# Altium PCB DC116A_PCB.PcbDoc (part 5 of 5)
Units mil, origin at the board's own origin, x right, y up, seen from the top; angles counter-clockwise.
Board outline 3300 x 2000 mil, 4 copper layers (Top Layer, GND1, PWR SPLIT PLANE, Bottom Layer), stack 58.64 mil thick; 315 components, 191 nets, 877 pads, 364 vias.
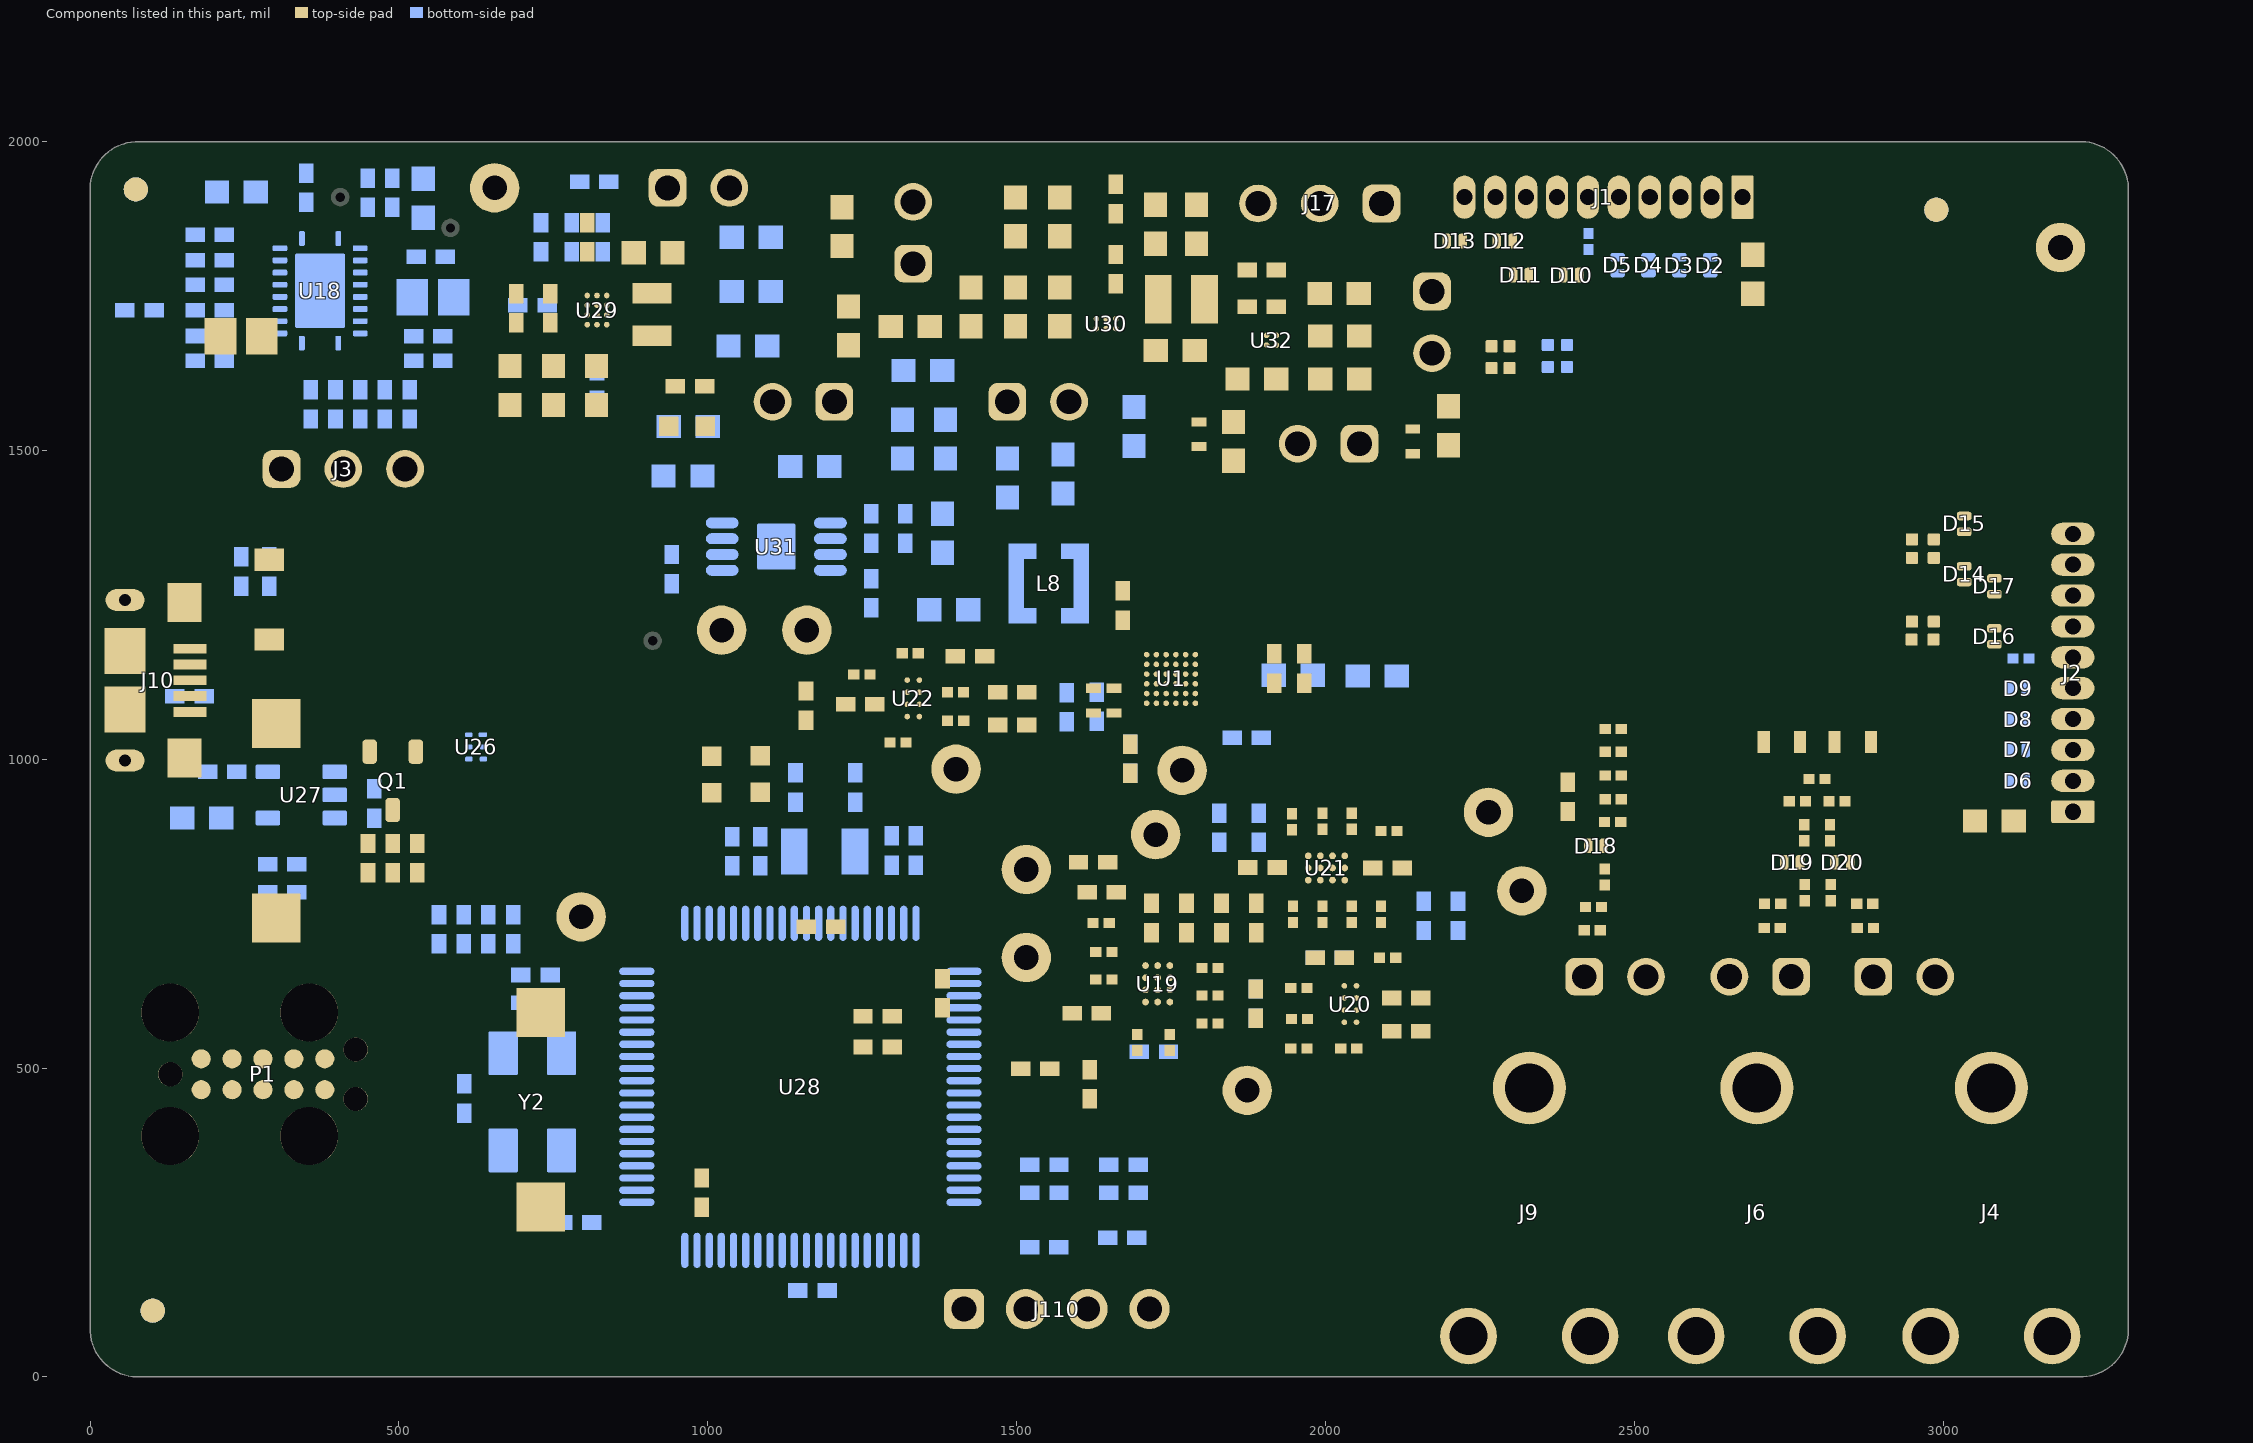
[diagram p6: the components of this part, seen from the top]

## Other copper
Top Layer:
  pour cut-out: 2273.54,1677.86 2268.4,1672.72 2268.4,1634.91 2272.99,1630.31 2297.54,1630.31 2303.83,1636.6 2303.83,1675.55 2302.54,1676.84
  pour cut-out: 2954,1365.27 2948.86,1360.13 2948.86,1322.32 2953.45,1317.72 2978,1317.72 2984.29,1324.01 2984.29,1362.96 2981.98,1365.27
  pour cut-out: 2954,1232.02 2948.86,1226.87 2948.86,1189.07 2953.45,1184.47 2978,1184.47 2984.29,1190.76 2984.29,1229.71 2983,1231
  pour cut-out: 1620.19,309.72 1619.17,310.73 1591.61,310.73 1591.61,330.97 1620,330.97
  pour cut-out: 1620,330.97
  pour cut-out: 1591.61,330.97
  pour cut-out: 441.16,677.96 441.16,665.23 443.94,662.45 447.96,662.45 447.96,677.01 445.28,679.69 444.22,679.69 442.21,677.68
  pour cut-out: 1706.44,1168.34 1706.44,1103.6 1713.04,1096.99 1780.54,1096.99 1784.46,1100.92 1784.46,1163.62 1771.25,1176.84 1714.94,1176.84
  pour cut-out: 1675.77,749.57 1931.08,749.57 1931.55,749.1 1931.55,740.35 1927.87,736.67 1678.79,736.67 1674.16,741.3 1674.16,742.99 1674.16,749.1
  pour cut-out: 1360.19,658.68 1360.19,692.08 1362.46,694.35 1367.36,694.35 1370.25,691.46 1370.25,663.21 1365.34,658.3 1364.97,658.68
  pour cut-out: 591.42,500.27 596.99,494.7 613.15,494.7 618.36,499.9 618.36,515.59 612.69,521.26 596.77,521.26 591.42,515.91
  pour cut-out: 714.82,1913.32 714.82,1890.45 716.34,1888.93 742.23,1888.93 744.37,1891.07 744.37,1912.24 739.65,1916.97 718.33,1916.97 714.98,1913.61
  pour cut-out: 1654.69,1707.71 1654.69,1683.34 1661.61,1676.43 1667.14,1676.43 1672.67,1670.9 1672.67,1657.59 1688.05,1642.21 1744.9,1642.21 1747.15,1644.46 1747.15,1694.23 1740.24,1701.14 1684.42,1701.14 1677.16,1708.4 1676.99,1708.23 1655.56,1708.23
  pour cut-out: 1323.96,1727.54 1331.65,1727.54 1332.08,1727.12 1332.08,1723.6 1331.06,1722.58 1323.93,1722.58 1322.44,1724.07 1322.45,1724.07 1322.45,1725.4
  pour cut-out: 1164.21,1841.07 1138.18,1841.07 1134.37,1844.88 1137.38,1847.89 1157.78,1847.89 1161.32,1844.36
  pour cut-out: 21.06,1335.41 21.06,911.82 14.73,905.48 1.78,905.48 0.11,907.16 0.11,1340.05 4.04,1343.99 18.43,1343.99 21,1341.41
  pour cut-out: 263,460.65 263,846.65 586.65,846.65 586.65,460.65
  pour cut-out: 1028.53,969.22 1036.6,969.22 1037.87,967.95 1037.87,966.81 1037.05,966 1031.75,966
  pour cut-out: 864.33,755.72 864.33,668.09 869.21,663.2 880.13,674.12 880.13,680.16
  pour cut-out: 725.19,1682.63 725.19,1663.85 727.93,1661.11 727.93,1684.55 726.78,1685.7
  pour cut-out: 2181.54,753.34 2181.54,739.43 2182.46,738.51 2184.16,738.51 2184.94,739.29 2184.94,753.11 2184.09,753.96 2182.37,753.96 2181.69,753.28
  text "1" at 123.52,757.21 h45
  text ".Layer_Name" at 577,-858.49 h60
PWR SPLIT PLANE:
  pour cut-out: 1596.27,326.31 1597.22,325.36 1597.22,311 1621.3,311 1623.55,313.24 1623.55,328.45 1598.42,328.45
  pour cut-out: 897.32,1617.26 897.32,1612.47 899.9,1609.89 902.01,1612 918.58,1612 923.69,1617.11 911.3,1629.49 901.02,1629.49 897,1625.47
  pour cut-out: 1829.66,1645.85 1846.93,1628.51 1852.24,1628.51 1858.64,1634.91 1858.64,1640.28 1841.37,1657.56
  pour cut-out: 1104.87,1839.92 1104.87,1765.8 1107.26,1763.41 1257.9,1763.41 1263.7,1769.22 1263.7,1771.61 1158.5,1876.81 1141.76,1876.81
  pour cut-out: 1816.05,1765.03 2132.05,1765.03 2135.25,1768.23 2135.25,1855.44 2125.07,1865.62 2075.8,1865.62 2029.92,1819.75 1908.7,1819.75 1863.85,1774.9 1819.5,1774.9
  pour cut-out: 1771.33,1143.05 1762.84,1143.06 1759.27,1139.49 1759.27,1135.02 1761.04,1133.25 1765.43,1133.25 1765.43,1130.12 1760.22,1130.12 1756.16,1134.17 1756.16,1140.42 1760.62,1144.88 1770.21,1144.88 1770.63,1144.46
  pour cut-out: 2134.09,1856.71 2134.09,1774.53 2122.72,1774.33 2119.96,1777.09 2119.96,1863.53 2121.74,1865.31 2125.74,1865.31 2128.35,1862.7
  pour cut-out: 1241.3,1617.25 1241.3,1548.28 1250.49,1548.28 1250.49,1617.31
  pour cut-out: 300.17,579.45 292.48,571.76 292.48,560.95 295.16,558.27 306.14,558.27 309.25,561.38
  pour cut-out: 21.06,1335.41 21.06,911.82 14.73,905.48 1.78,905.48 0.11,907.16 0.11,1340.05 4.04,1343.99 18.43,1343.99 21,1341.41
  pour cut-out: 403.64,1389.05 403.64,1290.49 405.94,1288.18 423.48,1288.18 429.7,1294.4 429.7,1390.36 428.18,1391.88
  pour cut-out: 1123.61,1305.66 1131.27,1298 1143.76,1298 1143.76,1308.81 1140.4,1312.17
  pour cut-out: 574.85,788.48 574.85,781.52 580.36,776.01 580.98,776.63 631.11,776.63 631.11,791.11 629.8,792.42 570.54,792.42 569.36,791.24
  pour cut-out: 468.65,1174.6 468.65,1164.65 469.63,1163.67 481.35,1163.67 481.35,1175.39 480.64,1176.11 465.63,1176.11
  pour cut-out: 128.58,1671.34 128.58,1658.62 131.4,1655.79 141.72,1655.79 144.41,1658.48 144.41,1672.19 143.42,1673.18
  pour cut-out: 419.48,1518.89 409.8,1518.89 406.32,1515.41 375.31,1515.41 372.51,1512.61 372.51,1510.02 373.75,1508.77 420.54,1508.77 424.71,1512.93
  pour cut-out: 1699.11,1117.18 1722.02,1094.28 1759.54,1094.28 1772.11,1106.85 1772.11,1125.32 1765.61,1131.82 1756.85,1131.82 1756.16,1132.5 1756.16,1140.67 1758.11,1142.61 1758.11,1153.62 1701.78,1153.62 1699.11,1150.95
  pour cut-out: 1760.3,1141.98 1773.43,1141.98 1778.57,1136.83 1779.63,1136.83 1779.63,1142.74 1779.63,1146.14 1777.67,1148.1 1759.15,1148.1 1757.64,1146.59 1757.64,1143.19 1758.94,1141.88
  text "3" at 116.47,756.52 h45
  text ".layer_name" at 625,-864 h60
GND1:
  pour cut-out: 1591.61,326.31 1591.61,333.85 1588.62,336.84 1595.13,343.35 1608.65,343.35 1608.65,324.21 1608.45,324 1608.45,323
  pour cut-out: 1593.76,328.45 1591.61,326.31 1591.61,310.73 1625.69,310.73 1625.69,330.97
  pour cut-out: 1466.45,331 1466.45,309.23 1467,308.68 1469.05,310.73 1498.39,310.73 1498.39,330.97
  pour cut-out: 1466.45,328.45
  text "2" at 117,763 h45
  text ".LAYER_NAME" at 727,-857 h60
Bottom Layer:
  pour cut-out: 1543.12,361.15 1543.39,361.42 1687,361.42 1687,323 1683,319 1680,322 1538.11,322
  pour cut-out: 1481.86,328 1483.84,329.98 1738.55,329.98 1738.55,311.71 1738.27,312 1479.26,312 1479.26,316.37 1482.23,319.34
  pour cut-out: 1844.09,1071.37
  pour cut-out: 1759,1050 1759.55,1050.55 1765.39,1050.55 1765.39,1012.5 1764.03,1011.14 1757.54,1011.14 1757.54,1049.75 1756.81,1050.49
  pour cut-out: 1612.46,1103.99
  pour cut-out: 1612.46,1122.46 1605.36,1122.46 1605.36,1082.99 1607.66,1085.29 1612.23,1085.29 1612.46,1085.51
  pour cut-out: 1621.59,1127.17
  pour cut-out: 1661,1694.43 1660.93,1680.63 1669.71,1671.84 1685.56,1671.84 1693.53,1679.81 1693.53,1694.2 1685.64,1702.09 1668.66,1702.09
  pour cut-out: 1756.81,809.07 1756.81,786.37 1764.53,778.64 1785.68,778.64 1790.39,783.36 1790.39,805.94 1782.82,813.51 1761.39,813.51 1756.96,809.08
  pour cut-out: 1994.29,626.58 1994.29,603.87 2002.01,596.15 2023.16,596.15 2027.88,600.86 2027.88,623.44 2020.3,631.01 1998.87,631.01 1994.44,626.58
  pour cut-out: 1935.2,828.95 1935.2,806.25 1942.92,798.52 1964.07,798.52 1968.79,803.24 1968.79,825.82 1961.21,833.39 1939.78,833.39 1935.35,828.96
  pour cut-out: 2121.84,1568.18 2121.84,1551.09 2129.05,1543.89 2152.46,1543.89 2159.07,1550.49 2159.07,1568.9 2148.86,1579.11 2132.77,1579.11
  pour cut-out: 1045.6,1586.77 1068.61,1586.77 1070.72,1584.66 1070.72,1584.07 1067.32,1580.66 1048.22,1580.66 1045.95,1582.93
  pour cut-out: 1725.47,1158.97 1725.61,1099.63 1727.22,1098.03 1772.58,1098.03 1776.86,1102.31 1776.86,1161.37 1770.54,1167.7 1734.19,1167.7
  pour cut-out: 1256.38,963.5 1220.78,963.5 1220.78,943.5 1256.38,943.5
  pour cut-out: 1161.08,963.5 1124.33,963.5 1124.33,943.5 1161.08,943.5
  pour cut-out: 1348.77,861.37 1325.2,861.37 1325.2,841.37 1348.77,841.37
  pour cut-out: 1325.2,860.09 1277.76,860.09 1277.76,841.37 1325.2,841.37
  pour cut-out: 1178.89,128.24 1178.89,151.84 1158.89,151.84 1158.89,128.24
  pour cut-out: 713.3,617.44 713.3,585.9 731.94,585.9 731.94,617.44
  pour cut-out: 582.56,441.47 625.95,441.47 625.95,461.47 582.56,461.47
  pour cut-out: 797.82,230.19 797.82,274.3 777.82,274.3 777.82,230.19
  pour cut-out: 673.24,715.8 704.72,715.8 704.72,732.8 673.24,732.8
  pour cut-out: 545.33,715.8 586.61,715.8 586.61,732.74 545.33,732.74
  pour cut-out: 773.87,1283.29 764.37,1283.29 750.74,1296.91 750.74,1318.74 763.1,1331.09 787.78,1331.09 797.61,1321.26 797.61,1295.32 785.58,1283.29 778.61,1283.29
  pour cut-out: 223.81,1886.38 223.81,1951.38 253.81,1951.38 253.81,1886.38
  pour cut-out: 185,1820 185,1795 205,1795 205,1820
  pour cut-out: 185,1780 185,1755 205,1755 205,1780
  pour cut-out: 185,1868.32 185,1625.95 205,1625.95 205,1868.32
  pour cut-out: 185,1657.34 185,1632.34 205,1632.34 205,1657.34
  pour cut-out: 304.49,1581.79 323.24,1563.04 495.73,1563.04 519.49,1586.79 519.49,1796.79 499.49,1816.79 324.49,1816.79 304.49,1796.79
  pour cut-out: 71.22,1746.72 71.22,1707.27 91.22,1707.27 91.22,1746.72
  pour cut-out: 223.08,961.84 223.08,1000 203.08,1000 203.08,961.84
  pour cut-out: 168.33,1088.97 168.33,1115.72 153.33,1115.72 153.33,1088.97
  pour cut-out: 258.24,1311.32 231.5,1311.32 231.5,1296.32 258.24,1296.32
  pour cut-out: 303.24,1311.32 276.5,1311.32 276.5,1296.32 303.24,1296.32
  pour cut-out: 540,1581.75 343.41,1581.75 343.41,1566.75 540,1566.75
  pour cut-out: 554.72,1631.76 554.72,1665.74 539.72,1665.74 539.72,1631.76
  pour cut-out: 21.06,1335.41 21.06,911.82 14.73,905.48 1.78,905.48 0.11,907.16 0.11,1340.05 4.04,1343.99 18.43,1343.99 21,1341.41
  pour cut-out: 2095.29,878.11 2017.86,878.11 2014.91,875.16 2014.91,871.83 2019.71,867.03 2092.83,867.03 2094.53,868.72
  text "4" at 147.02,755.41 h45
  text ".Layer_Name" at 577,-858.49 h60

## Silkscreen, mask and mechanical layers (free items; w line width, h text height)
Top Overlay:
  drawing of 214 lines, arcs and shapes, not listed
  text "GND" at 494,1896 h31
  text "GND" at 3153.66,1891 h30
  text "TX_SUP" at 2815,1820 h31 r45
  text "1" at 2015.16,1795.42 h30
  text "TX1" at 2639,1756.96 h30 r90
  text "TX2" at 2585.92,1756.31 h30 r90
  text "TX3" at 2535.63,1752.96 h30 r90
  text "TX4" at 2492.02,1750.84 h30 r90
  text "IO_SUP" at 958.92,1694.89 h31
  text "USB" at 528.93,1553 h31 r90
  text "VCC_BAT" at 458.68,1551.4 h31 r90
  text "GND" at 896.5,1517.99 h30 r90
  text "RX_SUP" at 1493,1474 h31
  text "1" at 1253.58,1457.77 h30
  text "MSP_AVCC" at 1384.56,1413.63 h31
  text "USB/BATT" at 310,1385 h31
  text "VCC_BAT" at 683.68,1319.66 h31 r90
  text "CNTRL1" at 1207,1262 h30
  text "ACC_SCL" at 927,1235 h31 r90
  text "VBUS" at 520,1131.6 h31
  text "TX8" at 3078,1089 h30
  text "GND" at 932,1071.1 h30
  text "TX7" at 3077,1045 h30
  text "AFE_SCL" at 1864,1037 h30
  text "TX6" at 3072,997.88 h30
  text "AFE_SDA" at 2150,992 h30
  text "TX5" at 3075,946 h30
  text "SDOUT" at 1786,894.36 h30
  text "RESETZ" at 1270.44,808 h30
  text "TX_SUP" at 3092.18,711 h30
  text "GND" at 639.81,706.94 h31
  text "ADC_RDY" at 1253,697 h30
  text "SEN" at 2233,694.35 h30
  text "PROG_OUT1" at 1860,369 h30
  text "TEXAS INSTRUMENTS" at 30,274 h30
  text "AFE4950EVM" at 703.89,134.31 h30
  text "DC116A" at 761.92,78.29 h30
  text ".Layer_Name" at 577,-858.49 h60
Bottom Overlay:
  circle w10: c1252.32,800.22 r3.33
  circle w10: c1217.33,1421.24 r3.33
  circle w6: c635.82,1847.36 r28.9
  circle w7: c2348.73,1431.18 r28.51
  lines w6: 122.1,1848.9 136.41,1848.9 ; 128,1803 135,1810 137,1810 ; 314,1978 314,1873 321,1866 ; 593,1879 605.55,1891.55 605.55,1920.54 ; 736,1786 748.65,1773.35 828,1773.35 850.35,1751 952,1751 959,1758 959,1767.72 ; 876,1542 876,1549 883,1556 894,1556 ; 1233,1327 1233,1428.24 1255,1450.24 1255,1452 1255,1655.23 1262.53,1662.76 ; 1298,1314 1309,1314 1333.59,1289.41 1407.49,1289.41 1419,1300.92 1419,1439 1432,1452 1432,1454 1432,1595 1472,1635 1483,1635 1524,1635 1544,1655 1544,1934.78 1527.78,1951 1468,1951 1381,1864 1381,1722 1362,1703 ; 1300.99,1701.22 1360.22,1701.22 ; 1525,1395 1534,1386 1644,1386 ; 1581,181 1590,172 1602,172 ; 1622,1443 1655,1443 ; 2499,1781 2499,1792 ; 2540.7,1787.3 2540.7,1801 ; 2598,1793 2598,1803
  lines w6.1: 25.49,1684.64 35.82,1694.97 ; 255.2,1728.07 268.66,1714.61 268.66,1633.57 ; 314,1978 325,1989 565.98,1989 605.55,1949.42 605.55,1920.54 ; 321,1866 325,1862 404,1862 ; 374.15,1514.45 379.72,1508.88 562.52,1508.88 567.53,1513.9 ; 466.28,1856.59 474.5,1848.37 497.96,1848.37 ; 1256.98,1657.21 1300.99,1701.22 ; 1473.08,435.87 1467.33,430.11 1467.33,392.93 1486.69,373.57 ; 2267.8,1414.6 2285.71,1396.69 2443.46,1396.69 2495.61,1448.83 2495.61,1539.84 2461.13,1574.32 2283.07,1574.32 2267.8,1559.05 2267.8,1414.6
  text "TX_SUP" at 1277.14,1898 h31
  text "A" at 625.21,1834.81 h30
  text "A" at 2338.51,1417.74 h30
  text ".Layer_Name" at 577,-858.49 h60
Top Paste:
  text ".Layer_Name" at 577,-858.49 h60
Bottom Paste:
  text ".Layer_Name" at 577,-858.49 h60
Top Solder:
  text ".Layer_Name" at 577,-858.49 h60
  text ".Layer_Name" at 577,-858.49 h60
Bottom Solder:
  text ".Layer_Name" at 577,-858.49 h60
Drill Guide:
  text ".Layer_Name" at 577,-858.49 h60
M1 Board Outline:
  the board outline again, w10
  text "'.Layer_Name'" at 615,-853 h72.83
M2 Board Dimensions:
  rectangle: 0,-275 125,-150
  rectangle: 125,-400 500,-275
  lines w7: 0,-275 1000,-275 ; 125,-400 125,-150 ; 250,-400 250,-150 ; 500,-400 500,-150 ; 750,-400 750,-150 ; 0,-400 1000,-400 1000,-150 0,-150 0,-400
M3 3D STEP Top:
  text ".Layer_Name" at 577,-858.49 h60
M4 3D STEP Bottom:
  text ".Layer_Name" at 577,-858.49 h60
M5 Assembly Top:
  circle w7: c2734.14,1917.74 r9.46
  circle w7: c1838.26,1693.62 r8.42
  circle w10: c783.82,289.12 r7.12
  circle w10: c351.73,753.14 r7.12
  circle w10: c936.43,1660.54 r2.43
  circle w6: c1337.09,160.65 r6.31
  region: 2382.68,647.98 2382.68,675.43 2369.95,675.43 2369.95,647.98
  region: 2615.73,660 2615.73,687.45 2603,687.45 2603,660
  region: 1420.79,1594.39 1420.79,1566.94 1433.52,1566.94 1433.52,1594.39
  region: 2188.25,1821.56 2160.8,1821.56 2160.8,1808.83 2188.25,1808.83
  region: 2106.54,1964 2079.09,1964 2079.09,1951.27 2106.54,1951.27
  rectangle: 1316.86,1738.08 1344.31,1750.81
  rectangle: 502.35,995.25 509.8,1028.55
  rectangle: 151.08,1165.38 164.54,1191.88
  rectangle: 872.9,1914.63 886.11,1944.16
  rectangle: 1422.05,1568.91 1435.14,1593.88
  rectangle: 1254.6,1567.09 1271.17,1592.14
  rectangle: 248.63,1458.11 258.8,1480.32
  rectangle: 248.63,1458.11 258.8,1480.32
  rectangle: 1254.6,1567.09 1271.17,1592.14
  rectangle: 1422.05,1568.91 1435.14,1593.88
  rectangle: 872.9,1914.63 886.11,1944.16
  rectangle: 2104.61,1499.2 2121.17,1524.25
  lines w6.1: 350.65,1345.1 388.65,1345.1 ; 369.68,1361.13 369.68,1343.89 ; 370.36,1307.76 370.36,1325 ; 369.68,1343.89 388.68,1324.89 350.68,1324.89 369.68,1343.89
  lines w10: -292,-930.17 6308,-930.17 ; -292,-726.83 6310,-726.83 ; -292,-523.5 -292,-1133.5 3713,-1133.5 6310,-1133.5 6310,-523.5 -291.5,-523.5 -291.5,-1133.5 1284,-1133.5 ; 2173,-1133.5 2173,-523.5 ; 3440,-726.83 3440,-523.5 ; 4280,-726.83 4280,-523.5 ; 4902,-1140 4902,-937.17
  text "K" at 1023,1483 h31
  text "K" at 1023,1066 h31 r90
  text "K" at 1100,1064 h31 r90
  text "COMPONENTS MARKED 'DNP' SHOULD NOT BE POPULATED." at 1153.5,-318.5 h60
  text "ASSEMBLY VARIANT:" at 1153,-434 h60
  text ".VariantName" at 2189,-434 h60
  text "PCB VIEWED FROM TOP SIDE" at -228.5,-655.67 h60
  text "BOARD #:" at 2248,-655.67 h60
  text ".PRJ_Number" at 2793.5,-655.67 h60
  text "REV:" at 3638,-655.67 h60
  text ".PCB_Rev" at 3929.5,-655.67 h60
  text "SVN REV:" at 4476,-655.67 h60
  text ".VersionControl_RevNumber" at 4982,-655.67 h60
  text ".LAYER_NAME" at 404,-849 h60
  text "TID #:" at 2248,-859 h60
  text ".TID" at 2793.5,-859 h60
  text "PLOT NAME =" at -228.5,-1064.34 h60
  text ".plot_File_Name" at 577,-1064.34 h60
  text "GENERATED    :" at 2250,-1064.34 h60
  text ".Print_Date" at 3119.5,-1064.34 h60
  text ".Print_Time" at 3848.5,-1064.34 h60
  text "TEXAS INSTRUMENTS" at 5113,-1064.34 h60
M6 Assembly Bottom:
  circle w6: c1518.3,1319.39 r8.94
  circle w6: c2721.51,1918.16 r3.56
  circle w6: c358.33,977.22 r6.55
  circle w10: c1239.3,834.7 r4.91
  lines w10: -292.5,-727.33 6309.5,-727.33 ; -290.5,-930.67 6309.5,-930.67 ; 1115.5,-1140.5 1115.5,-937.67 ; 1737.5,-727.33 1737.5,-524 ; 2577.5,-727.33 2577.5,-524 ; 3844.5,-1134 3844.5,-524 ; 4733.5,-1134 6309,-1134 6309,-524 -292.5,-524 -292.5,-1134 2304.5,-1134 6309.5,-1134 6309.5,-524
  text "COMPONENTS MARKED 'DNP' SHOULD NOT BE POPULATED." at 6102,-318 h60
  text ".VariantName" at 5058,-434 h60
  text "ASSEMBLY VARIANT:" at 6097,-434 h60
  text ".VersionControl_RevNumber" at 1035.5,-656.17 h60
  text "SVN REV:" at 1541.5,-656.17 h60
  text ".PCB_Rev" at 2088,-656.17 h60
  text "REV:" at 2379.5,-656.17 h60
  text ".PRJ_Number" at 3224,-656.17 h60
  text "BOARD #:" at 3769.5,-656.17 h60
  text "PCB VIEWED FROM BOTTOM SIDE" at 6246,-656.17 h60
  text ".LAYER_NAME" at 5316,-852 h60
  text ".TID" at 3224,-859.5 h60
  text "TID #:" at 3769.5,-859.5 h60
  text "TEXAS INSTRUMENTS" at 904.5,-1064.84 h60
  text ".Print_Time" at 2169,-1064.84 h60
  text ".Print_Date" at 2898,-1064.84 h60
  text "GENERATED    :" at 3767.5,-1064.84 h60
  text ".plot_File_Name" at 5440.5,-1064.84 h60
  text "PLOT NAME =" at 6246,-1064.84 h60
M9 Title Sheet:
  drawing of 57 lines, arcs and shapes, not listed
  text "1" at 739.84,8036.5 h70
  text "2" at 3235.5,8036.5 h70
  text "3" at 5724.84,8036.5 h70
  text "4" at 8231.51,8036.5 h70
  text "5" at 10730.5,8036.5 h70
  text "6" at 13235.5,8036.5 h70
  text "A" at -416.5,6893.5 h70
  text "A" at 14383.5,6893.5 h70
  text "B" at -416.5,4513.5 h70
  text "B" at 14383.5,4513.5 h70
  text "C" at -416.5,2138.5 h70
  text "C" at 14383.5,2138.5 h70
  text "PROJECT TITLE:" at 11343.5,277.5 h45
  text ".PRJ_Title" at 11393.5,144.17 h70
  text "DESIGNED FOR:" at 11343.5,-23.5 h45
  text ".PRJ_Customer" at 11393.5,-163.5 h70
  text "D" at -416.5,-231.5 h70
  text "D" at 14383.5,-231.5 h70
  text "FILE NAME:" at 11343.5,-323.5 h45
  text ".PCB_File_Name_No_Path" at 11393.5,-443.5 h70
  text "Texas Instruments (TI) and/or its licensors do not warrant the accuracy or completeness of this specification" at 6374,-605.34 h45
  text "ENGINEER:" at 11343.5,-613.5 h45
  text "LAYOUT BY:" at 12848.5,-613.5 h45
  text "or any information contained therein. TI and/or its licensors do not warrant that this design will meet" at 6329.01,-718 h45
  text ".PRJ_Engineer" at 11393.5,-768.49 h70
  text ".PCB_Layout" at 12899,-768.49 h70
  text "the specifications, will be suitable for your application or fit for any particular purpose, or will operate in" at 6329.01,-830.67 h45
  text "ALTIUM DESIGNER VERSION:" at 12848.5,-923.5 h45
  text "an implementation. TI and/or its licensors do not warrant that the design is production worthy. You should" at 6329.01,-943.33 h45
  text "completely validate and test your design implementation to confirm the system functionality for your application." at 6374,-1056 h45
  text ".print_Scale" at 11393.5,-1056.83 h70
  text ".Application_BuildNumber" at 12899,-1056.83 h70
  text "1" at 739.84,-1263.5 h70
  text "2" at 3235.5,-1263.5 h70
  text "3" at 5724.84,-1263.5 h70
  text "4" at 8231.51,-1263.5 h70
  text "5" at 10730.5,-1263.5 h70
  text "6" at 13235.5,-1263.5 h70
M10 Fab Notes:
  drawing of 173 lines, arcs and shapes, not listed
  text "DESIGN INFORMATION" at 12378.02,6201 h60
  text "MIN. TRACK WIDTH:" at 11733.46,6021 h60
  text "MIL" at 12984.46,6021 h60
  text "4.25" at 12725,6018 h60
  text "3.74" at 12710,5890 h60
  text "MIN. CLEARANCE:" at 11733.46,5889 h60
  text "MIL" at 12984.46,5889 h60
  text "MIN. VIA PAD SIZE:" at 11733.46,5757 h60
  text "12" at 12799.71,5757 h60
  text "MIL" at 12984.46,5757 h60
  text "0.05mm (2MIL)" at 12428.46,5615.29 h60
  text "MINIMUM ANNULAR RING" at 11404.23,5611 h60
  text "EXTERNAL" at 13136.46,5611 h60
  text "PER" at 11604.23,5493 h60
  text "IPC-D-275 CLASS 2 LEVEL C" at 11824.23,5493 h60
  text "MIL, HOLES" at 13312.46,5380.71 h60
  text "+/-" at 12920,5380 h60
  text "+/-" at 13774,5380 h60
  text "REGISTRATION TOLERANCES:" at 11404.23,5375 h60
  text "METAL" at 12604,5375 h60
  text "5" at 13180.2,5375 h60
  text "3" at 14013.2,5375 h60
  text "MIL" at 14129.46,5375 h60
  text "+/-" at 13774,5262 h60
  text "HOLE SIZE TOLERANCE (UNLESS OTHERWISE SPECIFIED):" at 11404.23,5257 h60
  text "3" at 14013.2,5257 h60
  text "MIL" at 14129.46,5257 h60
  text "MATERIAL:" at 11329.46,5047.54 h60
  text "FR-4 High Tg" at 12315.9,4907.21 h60
  text "FR-408" at 11750.46,4898.64 h60
  text "OTHER" at 13238.46,4898.64 h60
  text "X" at 12161,4895 h60
  text "62 MIL (1.6mm) +/-10%" at 12070.56,4735.92 h60
  text "THICKNESS:" at 11404.23,4731.64 h60
  text "X" at 11942.4,4731.64 h60
  text "OTHER" at 13355.46,4731.64 h60
  text "TOLERANCE:" at 11404.23,4573.64 h60
  text "X" at 12243.53,4573.64 h60
  text "ANSI IPC-6012 TYPE 3 CLASS 2" at 12430.48,4573.64 h60
  text "OTHER +/-" at 12430.46,4417.64 h60
  text "BOW & TWIST:" at 11404.23,4260.64 h60
  text "X" at 12243.53,4260.64 h60
  text "ANSI IPC-6012 TYPE 3 CLASS 2" at 12430.48,4260.64 h60
  text "NOTES:" at 5022,4112 h60
  text "OTHER +/-" at 12430.46,4102.13 h60
  text "1.THIS IS AN IMPEDANCE CONTROL BOARD." at 4971,3997 h60
  text "DRILLING:" at 11329.46,3963.64 h60
  text "2.TRACES WITH 4.9/11.1 MIL IN THE LAYER 01,TRACES WITH 5/11 MIL IN THE LAYER 4 ARE TO BE 100 OHMS +/- 10%  IMPEDANCE CONTROLLED" at 4970,3901 h60
  text "REFERENCE:" at 11404.23,3846.64 h60
  text "X" at 12052.46,3846.64 h60
  text "AS SHOWN" at 12239.46,3846.64 h60
  text "X" at 12953.46,3846.64 h60
  text "NC_DRILL FILES" at 13090.46,3846.64 h60
  text "3.TRACES WITH 6 MIL IN THE LAYER 01 , 4  AND 5 MIL TRACE WIDTH IN L02 ARE TO BE 50 OHMS +/- 10%  IMPEDANCE CONTROLLED" at 4968,3801 h60
  text "4.TRACES WITH 4.25/11.75 MIL IN THE LAYER 02 ARE TO BE 100 OHMS +/- 10%  IMPEDANCE CONTROLLED" at 4969,3714 h60
  text "PTH COPPER THICKNESS:" at 11404.23,3688.64 h60
  text "X" at 12534.46,3688.64 h60
  text "20-30 um" at 12671.46,3688.64 h60
  text "OTHER" at 13388.46,3688.64 h60
  text "5. ALL VIAS ARE TENTED. EXCEPT ON PAD VIAS AND  15 MIL  VIAS ON TOP SIDE." at 4969,3624 h60
  text "BOARD FINISH:" at 11329.46,3529.64 h60
  text "6.NON CONDUCTIVE VIA FILLING IS REQUIRED FOR ALL ON PAD VIAS" at 4979,3528 h60
  text "7. HARD GOLD PLATING REQUIRED FOR P1 CONNECTOR PADS ON TOP SIDE. FABRICATOR CAN DECIDE THE PLATING RANGE." at 4969,3417 h60
  text "SILKSCREEN:" at 11484.68,3411.64 h60
  text "X" at 12433.46,3411.64 h60
  text "TOP" at 12559.46,3411.64 h60
  text "X" at 12943.46,3411.64 h60
  text "BOTTOM" at 13070.46,3411.64 h60
  text "SILKSCREEN COLOR:" at 11484.68,3244.64 h60
  text "X" at 12432.42,3244.64 h60
  text "WHITE" at 12559.46,3244.64 h60
  text "OTHER" at 13070.46,3244.64 h60
  text "X" at 12563.42,3085.44 h60
  text "GREEN" at 12690.46,3085.44 h60
  text "OTHER" at 13308.46,3085.44 h60
  text "SOLDER RESIST COLOR:" at 11484.68,3074.64 h60
  text "X" at 12563.42,2915.44 h60
  text "MATTE" at 12690.46,2915.44 h60
  text "SEMI-GLOSS" at 13308,2914.8 h60
  text "IMMERSION GOLD (ENIG)" at 12390.46,2726.92 h60
  text "ENEPIG" at 13728,2723.64 h60
  text "SURFACE FINISH:" at 11329.46,2722.64 h60
  text "X" at 12203.51,2722.64 h60
  text "IMM. TIN/SILVER OR EQUIV" at 11659,2565.64 h60
  text "OTHER" at 13090.46,2565.64 h60
  text "ARRAY/PANEL:" at 11329.46,2386.64 h60
  text "CUT AND TRIM PER M1 BOARD OUTLINE" at 12390.46,2382.35 h60
  text "N.C. ROUTE" at 12390.46,2230.64 h60
  text "X" at 13069.46,2230.64 h60
  text "V. SCORE" at 13256.46,2230.64 h60
  text "CERTIFICATION:" at 11329.46,2093.64 h60
  text "MATERIALS AND WORKMANSHIP FOR ALL PCBS" at 12054.46,2093.64 h60
  text "Drill tolerance:" at 8112,2002 h60
  text "TO MEET OR EXCEED THE REQUIREMENTS OF:" at 12054.46,1995.64 h60
  text "For 6 mil blind via +0/-1 mil" at 8272,1873 h60
  text "X" at 11680.96,1859.13 h60
  text "ANSI IPC-A-600F CLASS ->" at 11819.96,1859.13 h60
  text "X" at 13459.02,1859.13 h60
  text "2" at 13577.96,1859.14 h60
  text "1" at 13262.96,1857.64 h60
  text "3" at 13931.96,1857.64 h60
  text "For 6 mil via +0/-1 mil" at 8280,1770 h60
  text "X" at 12495.02,1699.64 h60
  text "RoHS" at 12631.96,1699.64 h60
  text "OTHER" at 13276.36,1699.64 h60
  text "PER ORDER" at 13673.42,1699.64 h60
  text "For 7.87 mil via +0/-1 mil" at 8280,1612 h60
  text "ALL BOARDS MUST MEET OR EXCEED UL94-V0 REQUIREMENTS." at 11357,1534 h60
  text "For 10 mil via +0/-1 mil" at 8280,1454 h60
  text "PCB MUST BEAR THE UL94V-0 UL REGISTERED MATERIAL ID NUMBER" at 11357,1414 h60
  text "For 12 mil via +0/-1 mil" at 8280,1323 h60
  text "ADDITIONAL REQUIREMENTS:" at 11329.46,1240.64 h60
  text "For 15 mil via +0/-1 mil" at 8280,1198 h60
  text "MICROSECTION:" at 11404.23,1125.64 h60
  text "YES" at 12309.96,1125.64 h60
  text "For PTH +/- 3MIL" at 8282,1048 h60
  text "REQUIRED" at 13171.46,969.49 h60
  text "BARE BOARD ELEC. TEST:" at 11404.23,966.64 h60
  text "NONE" at 12709.96,966.64 h60
  text "X" at 13044.46,966.64 h60
  text "PER ORDER" at 13763.46,966.64 h60
  text "For NPTH +/-2 MIL" at 8282,893 h60
M11 Gerber Information:
  lines w10: -292,-930.17 6308,-930.17 ; -292,-726.83 6310,-726.83 ; -292,-523.5 -292,-1133.5 3713,-1133.5 6310,-1133.5 6310,-523.5 -291.5,-523.5 -291.5,-1133.5 1284,-1133.5 ; 2173,-1133.5 2173,-523.5 ; 3440,-726.83 3440,-523.5 ; 4280,-726.83 4280,-523.5 ; 4902,-1140 4902,-937.17
  text "ALL ARTWORK VIEWED FROM TOP SIDE" at -228.5,-655.67 h60
  text "BOARD #:" at 2248,-655.67 h60
  text "DC116E0" at 2793.5,-655.67 h60
  text "REV:" at 3638,-655.67 h60
  text ".PCB_Rev" at 3929.5,-655.67 h60
  text "SVN REV:" at 4476,-655.67 h60
  text ".VersionControl_RevNumber" at 4982,-655.67 h60
  text "LAYER NAME =" at -228.5,-858.49 h60
  text "TID #:" at 2248,-859 h60
  text ".TID" at 2793.5,-859 h60
  text "PLOT NAME =" at -228.5,-1064.34 h60
  text ".plot_File_Name" at 577,-1064.34 h60
  text "GENERATED    :" at 2250,-1064.34 h60
  text ".Print_Date" at 3119.5,-1064.34 h60
  text ".Print_Time" at 3848.5,-1064.34 h60
  text "TEXAS INSTRUMENTS" at 5113,-1064.34 h60
M12 Stackup:
  drawing of 295 lines, arcs and shapes, not listed
  text "Layer" at 6275.6,5474.5 h60
  text "Name" at 6685.51,5474.5 h60
  text "Material" at 7695.23,5474.5 h60
  text "Thickness" at 8555,5474.5 h60
  text "Constant" at 9204.84,5474.5 h60
  text "Board Layer Stack" at 9774.7,5474.5 h60
  text "1" at 6275.6,5354.5 h60
  text "Top Overlay" at 6685.51,5354.5 h60
  text "2" at 6275.6,5234.5 h60
  text "Top Solder" at 6685.51,5234.5 h60
  text "Solder Resist" at 7695.23,5234.5 h60
  text "0.40mil" at 8555,5234.5 h60
  text "3.5" at 9204.84,5234.5 h60
  text "3" at 6275.6,5114.5 h60
  text "Top Layer" at 6685.51,5114.5 h60
  text "Copper" at 7695.23,5114.5 h60
  text "0.58mil" at 8555,5114.5 h60
  text "4" at 6275.6,4994.5 h60
  text "Dielectric 1" at 6685.51,4994.5 h60
  text "FR-4 HIGH Tg" at 7695.23,4994.5 h60
  text "3.94mil" at 8555,4994.5 h60
  text "4.2" at 9204.84,4994.5 h60
  text "5" at 6275.6,4874.5 h60
  text "GND1" at 6685.51,4874.5 h60
  text "Copper" at 7695.23,4874.5 h60
  text "1.18mil" at 8555,4874.5 h60
  text "6" at 6275.6,4754.5 h60
  text "Dielectric2" at 6685.51,4754.5 h60
  text "FR-4 HIGH Tg" at 7695.23,4754.5 h60
  text "47.24mil" at 8555,4754.5 h60
  text "4.2" at 9204.84,4754.5 h60
  text "7" at 6275.6,4634.5 h60
  text "PWR SPLIT PLANE" at 6685.51,4634.5 h60
  text "Copper" at 7695.23,4634.5 h60
  text "1.18mil" at 8555,4634.5 h60
  text "8" at 6275.6,4514.5 h60
  text "Dielectric3" at 6685.51,4514.5 h60
  text "FR-4 HIGH Tg" at 7695.23,4514.5 h60
  text "3.94mil" at 8555,4514.5 h60
  text "4.2" at 9204.84,4514.5 h60
  text "9" at 6275.6,4394.5 h60
  text "Bottom Layer" at 6685.51,4394.5 h60
  text "Copper" at 7695.23,4394.5 h60
  text "0.58mil" at 8555,4394.5 h60
  text "10" at 6275.6,4274.5 h60
  text "Bottom Solder" at 6685.51,4274.5 h60
  text "Solder Resist" at 7695.23,4274.5 h60
  text "0.40mil" at 8555,4274.5 h60
  text "3.5" at 9204.84,4274.5 h60
  text "11" at 6275.6,4154.5 h60
  text "Bottom Overlay" at 6685.51,4154.5 h60
M13 Component Bodies Top:
  text ".Layer_Name" at 577,-858.49 h60
M14 Component Bodies Bottom:
  text ".Layer_Name" at 577,-858.49 h60
M15 Courtyards Top:
  text ".Layer_Name" at 577,-858.49 h60
M16 Courtyards Bottom:
  text ".Layer_Name" at 577,-858.49 h60
Drill Drawing:
  circle w10: c3796.63,2052.88 r16.56
  circle w10: c3796.63,2052.88 r27.59
  circle w10: c3796.63,1307.82 r27.59
  lines w10: 3769.04,811.12 3796.63,783.52 3824.23,811.12 3796.63,838.71 3769.04,811.12 ; 3769.04,921.5 3782.83,921.5 3796.63,907.7 3810.43,921.5 3824.23,921.5 3810.43,935.29 3824.23,949.09 3810.43,949.09 3796.63,962.89 3782.83,949.09 3769.04,949.09 3782.83,935.29 3769.04,921.5 ; 3769.04,1087.06 3824.23,1087.06 3796.63,1031.87 3769.04,1087.06 ; 3769.04,1156.05 3796.63,1169.85 3824.23,1156.05 3810.43,1183.64 3824.23,1211.24 3796.63,1197.44 3769.04,1211.24 3782.83,1183.64 3769.04,1156.05 ; 3769.04,1404.4 3769.04,1418.2 3782.83,1432 3769.04,1445.79 3769.04,1459.59 3782.83,1459.59 3796.63,1445.79 3810.43,1459.59 3824.23,1459.59 3824.23,1445.79 3810.43,1432 3824.23,1418.2 3824.23,1404.4 3810.43,1404.4 3796.63,1418.2 3782.83,1404.4 3769.04,1404.4 ; 3769.04,1528.58 3824.23,1528.58 3824.23,1583.77 3769.04,1583.77 3769.04,1528.58 ; 3769.04,1652.75 3824.23,1652.75 3824.23,1707.94 3769.04,1707.94 3769.04,1652.75 ; 3769.04,1790.73 3782.83,1790.73 3782.83,1776.93 3810.43,1776.93 3810.43,1790.73 3824.23,1790.73 3824.23,1818.32 3810.43,1818.32 3810.43,1832.12 3782.83,1832.12 3782.83,1818.32 3769.04,1818.32 3769.04,1790.73 ; 3769.04,1914.9 3782.83,1914.9 3796.63,1901.11 3810.43,1914.9 3824.23,1914.9 3810.43,1928.7 3824.23,1942.5 3810.43,1942.5 3796.63,1956.3 3782.83,1942.5 3769.04,1942.5 3782.83,1928.7 3769.04,1914.9 ; 3769.04,2149.46 3796.63,2163.26 3824.23,2149.46 3810.43,2177.05 3824.23,2204.65 3796.63,2190.85 3769.04,2204.65 3782.83,2177.05 3769.04,2149.46 ; 3769.04,2328.82 3824.23,2328.82 3796.63,2273.63 3769.04,2328.82 ; 3780.07,1663.79 3813.19,1663.79 3813.19,1696.91 3780.07,1696.91 3780.07,1663.79 ; 3780.07,1920.42 3788.35,1920.42 3796.63,1912.14 3804.91,1920.42 3813.19,1920.42 3804.91,1928.7 3813.19,1936.98 3804.91,1936.98 3796.63,1945.26 3788.35,1936.98 3780.07,1936.98 3788.35,1928.7 3780.07,1920.42 ; 3780.07,2160.5 3796.63,2168.77 3813.19,2160.5 3804.91,2177.05 3813.19,2193.61 3796.63,2185.33 3780.07,2193.61 3788.35,2177.05 3780.07,2160.5 ; 3780.07,2317.79 3813.19,2317.79 3796.63,2284.67 3780.07,2317.79 ; 4417.04,2931.09 4472.23,2931.09 4444.63,2875.9 4417.04,2931.09 ; 4428.07,2920.05 4461.19,2920.05 4444.63,2886.94 4428.07,2920.05
  lines w12: 3719,746.27 7660.29,746.27 ; 3719,2360.56 7660.29,2360.56 ; 4056.86,622.09 4056.86,2484.73 ; 4367,2838.65 6870.54,2838.65 ; 4367,2962.82 6870.54,2962.82 ; 4388.86,622.09 4388.86,2484.73 ; 4704.86,2714.47 4704.86,3087 ; 5025.42,622.09 5025.42,2484.73 ; 5036.86,2714.47 5036.86,3087 ; 5284.53,622.09 5284.53,2484.73 ; 5659.68,622.09 5659.68,2484.73 ; 5673.42,2714.47 5673.42,3087 ; 5932.53,2714.47 5932.53,3087 ; 6307.68,2714.47 6307.68,3087 ; 6383.06,622.09 6383.06,2484.73 ; 6945.58,622.09 6945.58,2484.73 ; 3719,622.09 7660.29,622.09 7660.29,2484.73 3719,2484.73 3719,622.09 ; 4367,2714.47 6870.54,2714.47 6870.54,3087 4367,3087 4367,2714.47
  text "Symbol" at 4441.51,3000.08 h72
  text "Quantity" at 4742.11,3000.08 h72
  text "Finished Hole Size" at 5074.12,3000.08 h72
  text "Plated" at 5710.67,3000.08 h72
  text "Hole Type" at 5969.78,3000.08 h72
  text "Drill Layer Pair" at 6344.93,3000.08 h72
  text "10" at 4742.11,2875.9 h60
  text "6.00mil (0.152mm)" at 5074.12,2875.9 h60
  text "PTH" at 5710.67,2875.9 h60
  text "Round" at 5969.78,2875.9 h60
  text "Top Layer - GND1" at 6344.93,2875.9 h60
  text "10 Total" at 4742.11,2751.72 h60
  text "Symbol" at 3793.51,2397.81 h72
  text "Quantity" at 4094.11,2397.81 h72
  text "Finished Hole Size" at 4426.12,2397.81 h72
  text "Plated" at 5062.67,2397.81 h72
  text "Hole Type" at 5321.78,2397.81 h72
  text "Drill Layer Pair" at 5696.93,2397.81 h72
  text "Hole Length" at 6420.32,2397.81 h72
  text "Routed Path Length" at 6982.83,2397.81 h72
  text "13" at 4094.11,2273.63 h60
  text "6.00mil (0.152mm)" at 4426.12,2273.63 h60
  text "PTH" at 5062.67,2273.63 h60
  text "Round" at 5321.78,2273.63 h60
  text "Top Layer - Bottom Layer" at 5696.93,2273.63 h60
  text "-" at 6420.32,2273.63 h60
  text "-" at 6982.83,2273.63 h60
  text "17" at 4094.11,2149.46 h60
  text "7.87mil (0.200mm)" at 4426.12,2149.46 h60
  text "PTH" at 5062.67,2149.46 h60
  text "Round" at 5321.78,2149.46 h60
  text "Top Layer - Bottom Layer" at 5696.93,2149.46 h60
  text "-" at 6420.32,2149.46 h60
  text "-" at 6982.83,2149.46 h60
  text "316" at 4094.11,2025.28 h60
  text "10.00mil (0.254mm)" at 4426.12,2025.28 h60
  text "PTH" at 5062.67,2025.28 h60
  text "Round" at 5321.78,2025.28 h60
  text "Top Layer - Bottom Layer" at 5696.93,2025.28 h60
  text "-" at 6420.32,2025.28 h60
  text "-" at 6982.83,2025.28 h60
  text "3" at 4094.11,1901.11 h60
  text "12.00mil (0.305mm)" at 4426.12,1901.11 h60
  text "PTH" at 5062.67,1901.11 h60
  text "Round" at 5321.78,1901.11 h60
  text "Top Layer - Bottom Layer" at 5696.93,1901.11 h60
  text "-" at 6420.32,1901.11 h60
  text "-" at 6982.83,1901.11 h60
  text "8" at 4094.11,1776.93 h60
  text "15.00mil (0.381mm)" at 4426.12,1776.93 h60
  text "PTH" at 5062.67,1776.93 h60
  text "Round" at 5321.78,1776.93 h60
  text "Top Layer - Bottom Layer" at 5696.93,1776.93 h60
  text "-" at 6420.32,1776.93 h60
  text "-" at 6982.83,1776.93 h60
  text "2" at 4094.11,1652.75 h60
  text "19.69mil (0.500mm)" at 4426.12,1652.75 h60
  text "PTH" at 5062.67,1652.75 h60
  text "Slot" at 5321.78,1652.75 h60
  text "Top Layer - Bottom Layer" at 5696.93,1652.75 h60
  text "47.24mil (1.200mm)" at 6420.32,1652.75 h60
  text "27.56mil (0.700mm)" at 6982.83,1652.75 h60
  text "20" at 4094.11,1528.58 h60
  text "26.00mil (0.660mm)" at 4426.12,1528.58 h60
  text "PTH" at 5062.67,1528.58 h60
  text "Round" at 5321.78,1528.58 h60
  text "Top Layer - Bottom Layer" at 5696.93,1528.58 h60
  text "-" at 6420.32,1528.58 h60
  text "-" at 6982.83,1528.58 h60
  text "3" at 4094.11,1404.4 h60
  text "39.00mil (0.991mm)" at 4426.12,1404.4 h60
  text "NPTH" at 5062.67,1404.4 h60
  text "Round" at 5321.78,1404.4 h60
  text "Top Layer - Bottom Layer" at 5696.93,1404.4 h60
  text "-" at 6420.32,1404.4 h60
  text "-" at 6982.83,1404.4 h60
  text "17" at 4094.11,1280.23 h60
  text "40.00mil (1.016mm)" at 4426.12,1280.23 h60
  text "PTH" at 5062.67,1280.23 h60
  text "Round" at 5321.78,1280.23 h60
  text "Top Layer - Bottom Layer" at 5696.93,1280.23 h60
  text "-" at 6420.32,1280.23 h60
  text "-" at 6982.83,1280.23 h60
  text "24" at 4094.11,1156.05 h60
  text "40.16mil (1.020mm)" at 4426.12,1156.05 h60
  text "PTH" at 5062.67,1156.05 h60
  text "Round" at 5321.78,1156.05 h60
  text "Top Layer - Bottom Layer" at 5696.93,1156.05 h60
  text "-" at 6420.32,1156.05 h60
  text "-" at 6982.83,1156.05 h60
  text "6" at 4094.11,1031.87 h60
  text "61.02mil (1.550mm)" at 4426.12,1031.87 h60
  text "PTH" at 5062.67,1031.87 h60
  text "Round" at 5321.78,1031.87 h60
  text "Top Layer - Bottom Layer" at 5696.93,1031.87 h60
  text "-" at 6420.32,1031.87 h60
  text "-" at 6982.83,1031.87 h60
  text "3" at 4094.11,907.7 h60
  text "78.74mil (2.000mm)" at 4426.12,907.7 h60
  text "PTH" at 5062.67,907.7 h60
  text "Round" at 5321.78,907.7 h60
  text "Top Layer - Bottom Layer" at 5696.93,907.7 h60
  text "-" at 6420.32,907.7 h60
  text "-" at 6982.83,907.7 h60
  text "4" at 4094.11,783.52 h60
  text "93.50mil (2.375mm)" at 4426.12,783.52 h60
  text "NPTH" at 5062.67,783.52 h60
  text "Round" at 5321.78,783.52 h60
  text "Top Layer - Bottom Layer" at 5696.93,783.52 h60
  text "-" at 6420.32,783.52 h60
  text "-" at 6982.83,783.52 h60
  text "436 Total" at 4094.11,659.35 h60
  text "Slot definitions :" at 3793.51,572.42 h60
  text "Routed Path Length" at 4243.51,572.42 h60
  text "= Calculated from tool start centre position to tool end centre position." at 4782.42,572.42 h60
  text "Hole Length" at 4243.51,522.75 h60
  text "= Routed Path Length + Tool Size = Slot length as defined in the PCB layout" at 4582.91,522.75 h60
  text "DrillDrawing1" at 577,-858.49 h60
M17 Embedded Cavity:
  text ".Layer_Name" at 577,-858.49 h60
M18 Embedded Assembly:
  text ".Layer_Name" at 577,-858.49 h60
M19 Embedded Keepout:
  text ".Layer_Name" at 577,-858.49 h60

## Dimensions
0,-400 to 1000,-400 on M2 Board Dimensions
0,0 to 3224,2000 on M2 Board Dimensions
0,0 to 0,1924 on M2 Board Dimensions

## Text inside footprints (layer, text, board x,y; h text height)
J10: M1 Board Outline "Board Edge" at -59.48,1029.38 h31.5 r270
Logo4: Bottom Overlay "For evaluation only; not FCC approved for resale." at 3091.07,1317.1 h60
ZZ1: M5 Assembly Top "Install label in silkscreened box after final wash.  Text shall be 8 pt font.  Text shall be per the Label Table in the PDF schematic." at 215,3290 h40